# Altium PCB DB32.PcbDoc (part 3 of 8)
Units mil, origin at the board's own origin, x right, y up, seen from the top; angles counter-clockwise.
Board outline 3236.22 x 4456.69 mil, 8 copper layers (Top Layer, MidLayer1, MidLayer2, GND-Layer5, MidLayer3, VCC, MidLayer4, Bottom Layer), stack 61.8 mil thick; 207 components, 474 nets, 1777 pads, 1474 vias.
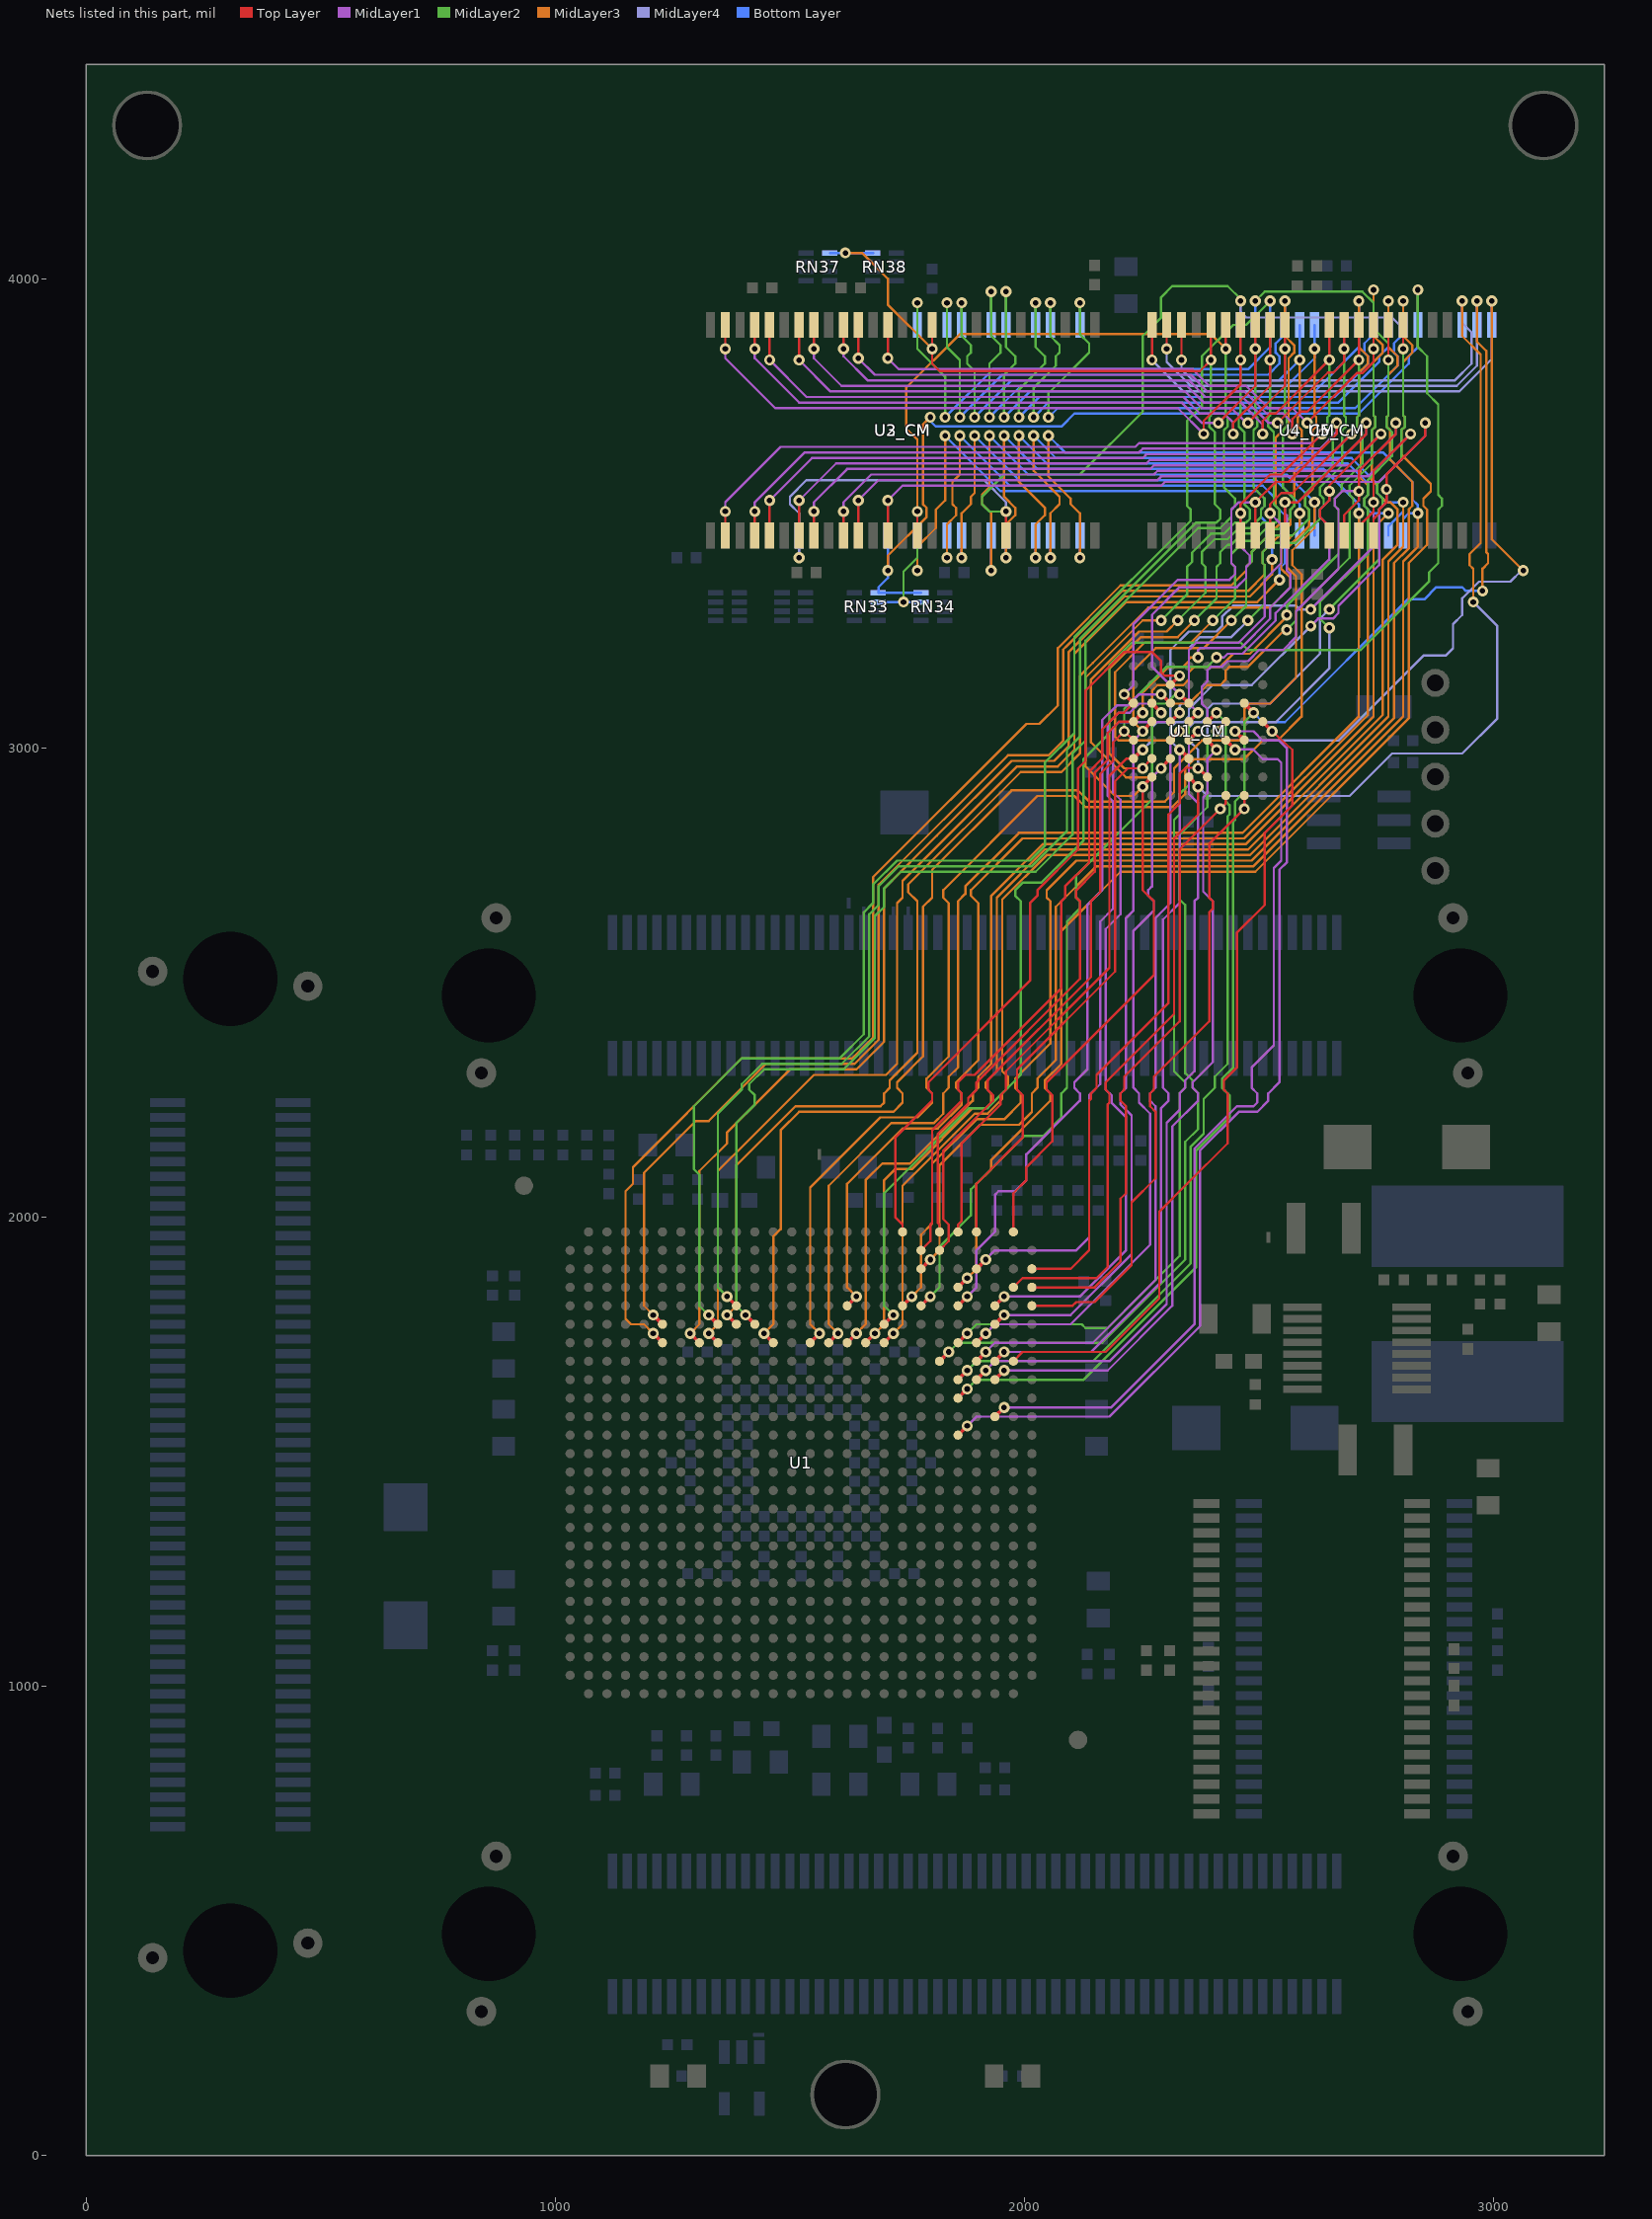
[diagram p9: the nets of this part, all layers, seen from the top]

## Via types
v1: diameter 23.62, hole 11.81, Top Layer to Bottom Layer, 839 vias
v2: diameter 23.62, hole 11.81, Top Layer to Bottom Layer, tented both sides, 499 vias
v3: diameter 27.56, hole 15.75, Top Layer to Bottom Layer, 135 vias
v4: diameter 23.62, hole 11.81, Top Layer to Bottom Layer, tented top, 1 vias

## Nets (pads, with @x,y where several pads share a name; then routed paths per layer and width w, separated by ;. In a path a pad name is that pad's centre, name@x,y a point inside that pad or via, vN(x,y) a via of type N, cw(c..) or ccw(c..) an arc to the next point about the centre after c; other vN are vias at no path point) (continued)
BUS_A16: U1.C26 U1_CM.D7 U2_CM.21 U3_CM.21 U4_CM.27 U5_CM.27 | length 4718.6
  Top Layer w5: U2_CM.21@1960.63,3452.76 v2(1960.63,3503.93) ; U1.C26@2015.75,1889.76 2078.74,1889.76 2090.55,1889.76 2098.43,1889.76 2137.8,1929.13 2137.8,2248.03 2141.73,2251.97 2141.73,2263.78 2153.54,2275.59 2153.54,2303.15 2307.09,2456.69 2307.09,2858.27 2330.71,2881.89 2330.71,2944.88 2343.51,2957.68 v1@2370.08,2957.68 ; v2(2807.09,3850.39) U4_CM.27@2807.09,3901.57
  Top Layer w7.87: v1@2370.08,2957.68 2370.57,2957.19 U1_CM.D7@2389.76,2937.99
  MidLayer2 w5: v2(1960.63,3503.93) 1925.2,3503.93 1909.45,3519.68 1909.45,3535.43 1925.2,3551.18 1956.69,3582.68 2118.11,3582.68 2251.97,3716.54 2251.97,3877.95 2291.34,3917.32 2291.34,3960.63 2314.96,3984.25 2433.07,3984.25 2460.63,3956.69 v2(2460.63,3952.76) ; v1(2649.61,3295.28) 2755.91,3401.57 2755.91,3507.87 2763.78,3515.75 2763.78,3531.5 2751.97,3543.31 2751.97,3562.99 2803.15,3614.17 2803.15,3677.17 2811.02,3685.04 2811.02,3704.72 2807.09,3708.66 v2(2807.09,3850.39)
  MidLayer4 w5: v2(1519.68,3405.51) 1519.68,3500 1500,3519.68 1500,3535.43 1535.43,3570.87 1913.38,3570.87 1960.63,3523.63 v2(1960.63,3503.93) ; v1(2370.08,2956.69) 2370.08,2996.06 2350.39,3015.75 2350.39,3043.31 2362.2,3055.12 2377.95,3055.12 2389.76,3066.93 2389.76,3082.68 2401.57,3094.49 2523.62,3094.49 2629.92,3200.79 2629.92,3275.59 v1(2649.61,3295.28) ; v2(2460.63,3952.76) 2460.63,3929.13 2472.44,3917.32 2783.46,3917.32 2807.09,3893.7 v2(2807.09,3850.39)
  Bottom Layer w5: v2(1519.68,3405.51) U3_CM.21@1519.68,3452.76 ; U5_CM.27@2460.63,3901.57 v2(2460.63,3952.76)
BUS_A17: U1.D25 U1_CM.E7 U4_CM.42 U5_CM.42 | length 3942.3
  Top Layer w5: U1.D25@1976.38,1850.39 1996.06,1870.08 2078.74,1870.08 2090.55,1870.08 2153.54,1870.08 2177.17,1893.7 2177.17,2240.16 2181.1,2244.09 2181.1,2263.78 2173.23,2271.65 2173.23,2287.4 2318.9,2433.07 2318.9,2807.09 2370.08,2858.27 v1(2370.08,2917.32) ; v2(2334.64,3826.77) U4_CM.42@2334.64,3901.57
  Top Layer w7.87: U1_CM.E7@2350.39,2937.99 v1(2370.08,2917.32)
  MidLayer3 w5: v2(2933.07,3952.76) 2933.07,3877.95 2972.44,3838.58 2972.44,3437.01 2948.82,3413.39 2948.82,3389.76 2956.69,3381.89 v1(2956.69,3311.02)
  MidLayer4 w5: v2(2334.64,3826.77) 2334.64,3807.09 2358.27,3783.46 2917.32,3783.46 2952.76,3818.9 2952.76,3885.83 2933.07,3905.51 v2(2933.07,3952.76) ; v1(2370.08,2917.32) 2389.76,2897.64 2692.91,2897.64 2783.46,2988.19 2933.07,2988.19 3007.87,3062.99 3007.87,3259.84 v1(2956.69,3311.02)
  Bottom Layer w5: U5_CM.42@2933.07,3901.57 v2(2933.07,3952.76)
BUS_A18: U1.K22 U1_CM.B3 U4_CM.43 U5_CM.43 | length 4116.9
  Top Layer w5: v2(2303.15,3850.39) U4_CM.43@2303.15,3901.57 ; v1(2488.19,3074.8) v1@2488.19,3075.79
  Top Layer w7.87: U1.K22@1858.27,1614.17 v1(1877.96,1633.86) ; U1_CM.B3@2468.5,3095.47 v1@2488.19,3075.79
  MidLayer2 w5: v1(1877.96,1633.86) 1897.64,1653.54 2078.74,1653.54 2090.55,1653.54 2125.98,1653.54 2366.14,1893.7 2366.14,2141.73 2437.01,2212.6 2437.01,2259.84 2421.26,2275.59 2421.26,2295.28 2444.88,2318.9 2444.88,2673.23 2444.88,2842.52 2448.82,2846.46 2448.82,2885.83 2468.5,2905.51 2468.5,2976.38 2468.5,3055.12 v1(2488.19,3074.8)
  MidLayer3 w5: v2(2964.57,3952.76) 2964.57,3866.14 2984.25,3846.46 2984.25,3417.32 2988.19,3413.39 2988.19,3393.7 2976.38,3381.89 v1(2976.38,3334.65)
  MidLayer4 w5: v2(2303.15,3850.39) 2303.15,3822.83 2354.33,3771.65 2921.26,3771.65 2964.57,3814.96 v2(2964.57,3952.76)
  Bottom Layer w5: v1(2488.19,3074.8) 2507.87,3055.12 2555.12,3055.12 2816.68,3316.68 2852.11,3316.68 2877.95,3342.52 2933.07,3342.52 2940.94,3334.65 v1(2976.38,3334.65) ; U5_CM.43@2964.57,3901.57 v2(2964.57,3952.76)
BUS_A19: U1.H21 U1_CM.C4 U4_CM.44 U5_CM.44 | length 4323.6
  Top Layer w5: v2(2271.65,3826.77) U4_CM.44@2271.65,3901.57
  Top Layer w7.87: U1.H21@1818.9,1692.91 v1(1838.59,1712.6) ; v1(2409.45,3035.43) U1_CM.C4@2429.13,3056.1
  MidLayer2 w5: v1(1838.59,1712.6) 1858.27,1732.28 2078.74,1732.28 2090.55,1732.28 2165.35,1732.28 2342.52,1909.45 2342.52,2160.43 2370.08,2187.99 2370.08,2263.78 2358.27,2275.59 2358.27,2291.34 2342.52,2307.09 2342.52,2665.35 2330.71,2677.17 2330.71,2814.96 2389.76,2874.02 2389.76,3015.75 v1(2409.45,3035.43)
  MidLayer3 w5: v2(2996.06,3952.76) 2996.06,3633.86 2996.06,3444.88 v1(3062.99,3377.95)
  MidLayer4 w5: v2(2271.65,3826.77) 2338.58,3759.84 2926.67,3759.84 2996.06,3829.23 v2(2996.06,3952.76) ; v1(2409.45,3035.43) 2429.13,3015.75 2669.29,3015.75 2850.39,3196.85 2897.64,3196.85 2913.39,3212.6 2913.39,3263.78 2933.07,3283.46 2933.07,3318.9 2968.5,3354.33 3035.43,3354.33 3059.06,3377.95 v1(3062.99,3377.95)
  Bottom Layer w5: U5_CM.44@2996.06,3901.57 v2(2996.06,3952.76)
BUS_A20: U1.J24 U1_CM.D5 U4_CM.28 U5_CM.28 | length 3363.5
  Top Layer w5: v2(2775.59,3826.77) U4_CM.28@2775.59,3901.57
  Top Layer w7.87: U1.J24@1937.01,1653.54 v1(1956.7,1673.23) ; U1_CM.D5@2389.76,3016.73 v1(2409.45,2996.06)
  MidLayer1 w5: v1(1956.7,1673.23) 2078.74,1673.23 2090.55,1673.23 2177.17,1673.23 2314.96,1811.02 2314.96,2192.91 2370.08,2248.03 2370.08,2263.78 2358.27,2275.59 2358.27,2287.4 2401.57,2330.71 2401.57,2673.23 2380.91,2693.9 2380.91,2894.69 2389.76,2903.54 2389.76,2976.38 v1(2409.45,2996.06)
  MidLayer2 w5: v2(2492.13,3952.76) 2511.81,3972.44 2720.47,3972.44 2744.09,3948.82 2744.09,3893.7 2775.59,3862.21 v2(2775.59,3826.77) 2775.59,3708.66 2771.65,3704.72 2771.65,3685.04 2783.46,3673.23 2783.46,3622.05 2732.28,3570.87 2732.28,3539.37 2724.41,3531.5 2724.41,3515.75 2732.28,3507.87 2732.28,3413.39 2629.92,3311.02 2629.92,3275.59 v1(2649.61,3255.91)
  MidLayer4 w5: v1(2409.45,2996.06) 2389.76,3015.75 2389.76,3043.31 2401.57,3055.12 2535.43,3055.12 2649.61,3169.29 v1(2649.61,3255.91)
  Bottom Layer w5: U5_CM.28@2492.13,3901.57 v2(2492.13,3952.76)
BUS_A21: U1.J22 U1_CM.D4 | length 1844.8
  Top Layer w7.87: U1.J22@1858.27,1653.54 v1(1877.96,1673.23) ; U1_CM.D4@2389.76,3056.1 v1(2409.45,3074.8)
  MidLayer2 w5: v1(1877.96,1673.23) 1897.64,1692.91 2078.74,1692.91 2090.55,1692.91 2145.67,1692.91 2354.33,1901.57 2354.33,2150.59 2381.89,2178.15 2381.89,2251.97 2405.51,2275.59 2405.51,2299.21 2433.07,2326.77 2433.07,2749.01 2433.07,2854.33 2437.01,2858.27 2437.01,2877.95 2429.13,2885.83 2429.13,2909.45 2429.13,3055.12 v1(2409.45,3074.8)
BUS_A22: U1.L24 U1_CM.C5 | length 1949.8
  Top Layer w7.87: U1.L24@1937.01,1574.8 v1(1956.7,1594.49) ; U1_CM.C5@2429.13,3016.73 v1@2448.82,2997.05
  MidLayer1 w5: v1(1956.7,1594.49) 2078.74,1594.49 2090.55,1594.49 2185.04,1594.49 2362.2,1771.65 2362.2,2145.67 2452.76,2236.22 2488.19,2236.22 2496.06,2244.09 2496.06,2263.78 2484.25,2275.59 2484.25,2318.9 2531.5,2366.14 2531.5,2744.09 2547.24,2759.84 2547.24,2968.5 2539.37,2976.38 2507.87,2976.38 2487.2,2997.05 v1@2448.82,2997.05
  Bottom Layer w5: v1@2447.83,2997.05 v1@2448.82,2997.05
  other v1: 2448.82,2996.06
BUS_A23: U1.E26 U1_CM.B8 | length 1380.3
  Top Layer w5: U1.E26@2015.75,1811.02 2078.74,1811.02 2090.55,1811.02 2102.36,1811.02 2110.24,1818.9 2149.6,1818.9 2228.35,1897.64 2228.35,2031.5 2279.53,2082.68 2279.53,2224.41 2267.72,2236.22 2267.72,2263.78 2275.59,2271.65 2275.59,2299.21 2393.7,2417.32 2393.7,2649.61 2401.57,2657.48 2401.57,2673.23 2393.7,2681.1 2393.7,2731.56 ; 2393.7,2716.54 2393.7,2795.28 v1(2468.51,2870.08) U1_CM.B8@2468.5,2898.62
BUS_A24: U1.D26 U1_CM.C8 | length 1307.7
  Top Layer w5: U1.D26@2015.75,1850.39 2078.74,1850.39 2090.55,1850.39 2149.61,1850.39 2204.72,1905.51 2204.72,2039.37 2216.54,2051.18 2216.54,2236.22 2204.72,2248.03 2204.72,2263.78 2212.6,2271.65 2212.6,2299.21 2330.71,2417.32 2330.71,2783.46 v1(2417.32,2870.08) 2429.14,2881.89 U1_CM.C8@2429.13,2898.62
BUS_D0: U1.E20 U1_CM.E3 U2_CM.2 U4_CM.7 | length 3888
  Top Layer w5: U2_CM.2@1362.2,3452.76 v2(1362.2,3503.93) ; U4_CM.7@2460.63,3452.76 v1(2460.63,3500) 2460.63,3519.69 2523.62,3582.68 2547.24,3582.68 v2(2633.86,3669.29)
  Top Layer w7.87: U1.E20@1779.53,1811.02 v1(1799.21,1830.71) ; v1(2330.71,3114.17) U1_CM.E3@2350.4,3095.48
  MidLayer1 w5: v2(1362.2,3503.93) 1362.2,3523.62 1480.31,3641.73 2236.22,3641.73 2244.09,3649.61 2614.17,3649.61 v2(2633.86,3669.29) ; v1(2330.71,3114.17) 2271.65,3173.23 2271.65,3283.46 2330.71,3342.52 2452.76,3342.52 2472.44,3362.2 2472.44,3385.83 2480.31,3393.7 2480.31,3409.45 2460.63,3429.13 v1(2460.63,3500)
  MidLayer2 w5: v1(1799.21,1830.71) 1818.9,1850.39 1818.9,1937.01 1885.83,2003.94 1885.83,2031.5 1885.83,2043.31 1885.83,2059.06 2000,2173.23 2039.37,2173.23 2078.74,2212.6 2078.74,2263.78 2090.55,2275.59 2090.55,2629.92 2118.11,2657.48 2118.11,2673.23 2110.24,2681.1 2110.24,2728.35 2271.65,2889.76 2271.65,3086.61 2279.53,3094.49 2302.17,3094.49 2321.85,3114.17 v1(2330.71,3114.17)
BUS_D1: U1.B20 U1_CM.H3 U2_CM.4 U4_CM.8 | length 3743.3
  Top Layer w5: U2_CM.4@1425.2,3452.76 v2(1425.19,3503.93) ; U1.B20@1779.53,1929.13 1799.21,1948.82 1799.21,1984.25 1803.15,1988.19 1803.15,2031.5 1803.15,2043.31 1803.15,2185.04 1866.14,2248.03 1866.14,2263.78 1858.27,2271.65 1858.27,2287.4 1874.02,2303.15 1893.7,2303.15 2078.74,2488.19 2078.74,2673.23 2086.61,2681.1 2086.61,2704.73 2137.8,2755.91 2137.8,2949.54 2165.35,2977.1 2165.35,3039.37 2201.28,3075.3 2212.1,3075.3 U1_CM.H3@2232.29,3095.48 ; U4_CM.8@2492.13,3452.76 v1(2492.13,3523.62) 2535.43,3566.93 2562.99,3566.93 2665.35,3669.29 v2(2665.35,3692.91)
  Top Layer w7.87: v1(2212.6,3114.17) U1_CM.H3@2232.29,3095.48
  MidLayer1 w5: v2(1425.19,3503.93) 1425.19,3523.62 1531.5,3629.92 2244.09,3629.92 2251.97,3637.8 2629.92,3637.8 2665.35,3673.23 v2(2665.35,3692.91) ; v1(2212.6,3114.17) 2232.28,3133.86 2232.28,3263.78 2326.77,3358.27 2437.01,3358.27 2448.82,3370.08 2448.82,3385.83 2440.94,3393.7 2440.94,3507.87 2456.69,3523.62 v1(2492.13,3523.62)
BUS_D2: U1.G22 U1_CM.E4 U2_CM.5 U4_CM.9 | length 4029.6
  Top Layer w5: U2_CM.5@1456.69,3452.76 v2(1456.69,3527.55) ; U4_CM.9@2523.62,3452.76 v1(2523.62,3500) 2523.62,3519.69 2547.24,3543.31 2570.87,3543.31 v2(2696.85,3669.29)
  Top Layer w7.87: U1.G22@1858.27,1732.28 v1(1877.95,1751.97) ; U1_CM.E4@2350.39,3056.1 v1(2370.08,3074.81)
  MidLayer1 w5: v2(1456.69,3527.55) 1547.24,3618.11 2251.97,3618.11 2259.84,3625.98 2653.54,3625.98 v2(2696.85,3669.29) ; v1(2370.08,3074.81) 2350.39,3094.5 2350.39,3208.66 2366.14,3224.41 2456.69,3224.41 2511.81,3279.53 2511.81,3358.27 2547.24,3393.7 2547.24,3476.38 v1(2523.62,3500)
  MidLayer2 w5: v1(1877.95,1751.97) 1897.64,1771.65 2078.74,1771.65 2090.55,1771.65 2122.05,1771.65 2129.92,1763.78 2177.17,1763.78 2330.71,1917.32 2330.71,2263.78 2342.52,2275.59 2342.52,2287.4 2318.9,2311.02 2318.9,2846.46 2330.71,2858.27 2330.71,2901.57 2350.39,2921.26 2350.39,3055.12 v1(2370.08,3074.81)
BUS_D3: U1.A21 U1_CM.H4 U2_CM.7 U4_CM.10 | length 3670.1
  Top Layer w5: U2_CM.7@1519.69,3452.76 v2(1519.68,3527.56) ; U1.A21@1818.9,1968.5 1818.9,1984.25 1814.96,1988.19 1814.96,2031.5 1814.96,2043.31 1814.96,2177.17 1879.92,2242.13 1879.92,2253.94 1897.64,2271.65 1897.64,2287.4 2118.11,2507.87 2118.11,2673.23 2110.24,2681.1 2110.24,2696.85 2149.61,2736.22 2149.61,2947.21 2177.17,2974.77 2177.17,3031.5 2201.78,3056.11 U1_CM.H4@2232.28,3056.1 ; U4_CM.10@2555.12,3452.76 v1(2555.12,3523.62) 2582.68,3523.62 2640.75,3581.69 2728.35,3669.29 v2(2728.35,3692.91)
  Top Layer w7.87: U1_CM.H4@2232.28,3056.1 v1@2251.47,3075.3
  MidLayer1 w5: v2(1519.68,3527.56) 1598.43,3606.3 2259.84,3606.3 2267.72,3614.17 2673.23,3614.17 2728.35,3669.29 v2(2728.35,3692.91) ; v1(2370.08,3192.91) 2370.08,3208.66 2374.02,3212.6 2460.63,3212.6 2523.62,3275.59 2523.62,3299.21 2566.93,3342.52 2566.93,3370.08 2559.06,3377.95 2559.06,3496.06 2555.12,3500 v1(2555.12,3523.62)
  MidLayer3 w5: v1(2251.97,3074.8) 2251.97,3118.11 2255.91,3122.05 2307.09,3173.23 2338.58,3173.23 2350.39,3185.04 2350.39,3188.98 2354.33,3192.91 v1(2370.08,3192.91)
BUS_D4: U1.B21 U1_CM.H5 U2_CM.8 U4_CM.13 | length 3722
  Top Layer w5: U2_CM.8@1551.18,3452.76 v2(1551.18,3503.94) ; U1.B21@1818.9,1929.13 1838.58,1948.82 1838.58,1984.25 1826.77,1996.06 1826.77,2031.5 1826.77,2043.31 1826.77,2141.73 1933.07,2248.03 1933.07,2259.84 1921.26,2271.65 1921.26,2291.34 2141.73,2511.81 2141.73,2673.23 2161.42,2692.91 2161.42,2944.88 2188.98,2972.44 2188.98,3011.81 v1(2212.6,3035.43) U1_CM.H5@2232.28,3016.73 ; U4_CM.13@2649.61,3452.76 2649.61,3472.44 2629.92,3492.13 2629.92,3507.87 2649.61,3527.56 v1(2649.61,3547.24) 2649.61,3559.06 v2(2759.84,3669.29)
  MidLayer1 w5: v2(1551.18,3503.94) 1551.18,3523.62 1622.05,3594.49 2267.72,3594.49 2275.59,3602.36 2692.91,3602.36 v2(2759.84,3669.29) ; v1(2409.45,3192.91) 2425.2,3192.91 2433.07,3200.79 2464.57,3200.79 2535.43,3271.65 2535.43,3287.4 2649.61,3401.57 2649.61,3472.44 2629.92,3492.13 2629.92,3507.87 2649.61,3527.56 v1(2649.61,3547.24)
  MidLayer2 w5: v1(2212.6,3035.43) 2212.6,3082.68 2303.15,3173.23 2389.76,3173.23 v1(2409.45,3192.91)
BUS_D5: U1.J23 U1_CM.E5 U2_CM.10 U4_CM.14 | length 4157.5
  Top Layer w5: U2_CM.10@1614.17,3452.76 v2(1614.17,3503.93) ; U4_CM.14@2681.1,3452.76 2681.1,3496.06 2712.6,3527.56 v1(2712.6,3547.24) 2712.6,3590.55 2791.34,3669.29 v2(2791.34,3692.91)
  Top Layer w7.87: U1.J23@1897.64,1653.54 v1(1917.33,1673.23) ; U1_CM.E5@2350.39,3016.73 v1(2370.08,3035.43)
  MidLayer1 w5: v2(1614.17,3503.93) 1614.17,3523.62 1673.23,3582.68 2275.59,3582.68 2283.46,3590.55 2712.6,3590.55 2791.34,3669.29 v2(2791.34,3692.91) ; v1(1917.33,1673.23) 1937.01,1692.91 2078.74,1692.91 2090.55,1692.91 2181.1,1692.91 2303.15,1814.96 2303.15,2200.79 2330.71,2228.35 2330.71,2263.78 2342.52,2275.59 2342.52,2291.34 2362.2,2311.02 2362.2,2673.23 2370.08,2681.1 2370.08,2720.47 ; 2370.08,2704.72 2370.08,2720.47 ; v1(2712.6,3547.24) 2677.17,3547.24 2661.42,3531.5 2661.42,3515.75 2669.29,3507.87 2669.29,3381.89 2578.74,3291.34 2578.74,3236.22 2551.18,3208.66 2500,3208.66 2476.38,3185.04 2433.07,3185.04 2421.26,3173.23 2397.64,3173.23 2389.76,3165.35 2389.76,3141.73 2377.95,3129.92 2377.95,3094.49 2389.76,3082.68 2389.76,3055.12 v1(2370.08,3035.43) 2350.39,3015.75 2350.39,2901.57 2370.08,2881.89 2370.08,2720.47
BUS_D6: U1.A22 U1_CM.H6 U2_CM.11 U4_CM.15 | length 3658.7
  Top Layer w5: U2_CM.11@1645.67,3452.76 v2(1645.66,3527.55) ; U1.A22@1858.27,1968.5 1858.27,1984.25 1866.14,1992.13 1866.14,2031.5 1866.14,2043.31 1866.14,2157.48 1948.82,2240.16 1948.82,2259.84 1960.63,2271.65 1960.63,2311.02 2181.1,2531.5 2181.1,2940.94 2217.52,2977.37 U1_CM.H6@2232.28,2977.36 ; U4_CM.15@2712.6,3452.76 2712.6,3472.44 2744.09,3503.94 v1(2744.09,3523.62) 2744.09,3590.55 v2(2822.83,3669.29)
  Top Layer w7.87: U1_CM.H6@2232.28,2977.36 2251.47,2996.56 v1@2251.97,2997.05
  MidLayer1 w5: v2(1645.66,3527.55) 1688.98,3570.87 2283.46,3570.87 2291.34,3578.74 2732.28,3578.74 v2(2822.83,3669.29) ; v1(2610.24,3295.28) 2744.09,3429.13 v1(2744.09,3523.62)
  MidLayer4 w5: v1(2251.97,2996.06) 2271.65,3015.75 2271.65,3043.31 2283.46,3055.12 2303.15,3055.12 2311.02,3062.99 2311.02,3208.66 2350.39,3248.03 2409.45,3248.03 2421.26,3259.84 2421.26,3279.53 2444.88,3303.15 2578.74,3303.15 2586.61,3295.28 v1(2610.24,3295.28)
BUS_D7: U1.H24 U1_CM.E6 U2_CM.13 U4_CM.16 | length 4054
  Top Layer w5: U2_CM.13@1708.66,3452.76 v2(1708.66,3527.55) ; U4_CM.16@2744.09,3452.76 2744.09,3488.19 2755.91,3500 2755.91,3507.87 2771.65,3523.62 v1(2771.65,3551.18) 2771.65,3582.68 2854.33,3665.35 v2(2854.33,3692.91)
  Top Layer w7.87: U1.H24@1937.01,1692.91 v1(1956.7,1712.6) ; v1@2330.71,2997.05 2331.2,2996.56 U1_CM.E6@2350.39,2977.36
  MidLayer1 w5: v2(1708.66,3527.55) 1740.16,3559.06 2291.34,3559.06 2299.21,3566.93 2755.91,3566.93 2854.33,3665.35 v2(2854.33,3692.91) ; v1(1956.7,1712.6) 2078.74,1712.6 2090.55,1712.6 2141.73,1712.6 2291.34,1862.2 2291.34,2232.28 2307.09,2248.03 2307.09,2263.78 2295.28,2275.59 2295.27,2633.86 2330.71,2669.29 2330.71,2700.79 ; 2330.71,2681.1 v1(2330.71,2996.06) v1@2330.71,2997.05 ; v1(2610.24,3259.84) 2625.98,3275.59 2657.48,3275.59 2669.29,3287.4 2669.29,3303.15 2755.91,3389.76 2755.91,3507.87 2771.65,3523.62 v1(2771.65,3551.18)
  MidLayer4 w5: v1(2330.71,2996.06) 2311.02,3015.75 2311.02,3043.31 2322.83,3055.12 2338.58,3055.12 2350.39,3066.93 2350.39,3082.68 2401.57,3133.86 2484.25,3133.86 v1(2610.24,3259.84)
BUS_D8: U1.E22 U1_CM.F3 U2_CM.42 U4_CM.29 | length 3915.8
  Top Layer w5: v2(1708.66,3830.71) U2_CM.42@1708.66,3901.57 ; v2(2602.36,3692.91) 2708.17,3798.72 2719.98,3798.72 2744.09,3822.83 v2(2744.09,3850.39) U4_CM.29@2744.09,3901.57
  Top Layer w7.87: U1.E22@1858.27,1811.02 v1(1877.95,1830.71) ; v1@2291.34,3115.16 2291.83,3114.67 U1_CM.F3@2311.03,3095.48
  MidLayer1 w5: v2(1708.66,3830.71) 1732.28,3807.09 2358.27,3807.09 2393.7,3771.65 2472.44,3771.65 2519.69,3724.41 2570.87,3724.41 v2(2602.36,3692.91) ; v1(1877.95,1830.71) 1897.64,1850.39 1897.64,1929.13 1937.01,1968.5 1937.01,2031.5 1937.01,2043.31 1937.01,2047.24 1944.88,2055.12 1980.31,2055.12 2003.94,2078.74 2003.94,2133.86 2118.11,2248.03 2118.11,2263.78 2106.3,2275.59 2106.3,2287.4 2133.86,2314.96 2133.86,2665.35 2165.35,2696.85 2165.35,3059.06 2196.85,3090.55 2220.47,3090.55 2244.09,3114.17 v1(2291.34,3114.17)
  MidLayer2 w5: v1(2559.06,3251.97) 2578.74,3271.65 2578.74,3291.34 2692.91,3405.51 2692.91,3507.87 2700.79,3515.75 2700.79,3531.5 2692.91,3539.37 2692.91,3559.06 2740.16,3606.3 2740.16,3677.17 2748.03,3685.04 2748.03,3704.72 2744.09,3708.66 v2(2744.09,3850.39)
  MidLayer3 w5: v1(2291.34,3114.17) 2311.02,3094.49 2350.39,3094.49 2389.76,3133.86 2417.32,3133.86 2429.13,3145.67 2429.13,3165.35 2437.01,3173.23 2476.38,3173.23 2555.12,3251.97 v1(2559.06,3251.97)
BUS_D9: U1.C23 U1_CM.G3 U2_CM.44 U4_CM.30 | length 4002.3
  Top Layer w5: v2(1645.67,3830.71) U2_CM.44@1645.67,3901.57 ; v2(2570.87,3669.29) 2570.87,3700.79 2586.61,3716.54 2602.36,3716.54 v2(2712.6,3826.77) U4_CM.30@2712.6,3901.57
  Top Layer w7.87: U1.C23@1897.64,1889.76 v1(1917.32,1909.45) ; U1_CM.G3@2271.65,3095.48 v1(2291.34,3074.8)
  MidLayer1 w5: v2(1645.67,3830.71) 1681.1,3795.28 2354.33,3795.28 2389.76,3759.84 2469,3759.84 2516.24,3712.6 2551.18,3712.6 2570.87,3692.91 v2(2570.87,3669.29) ; v1(1917.32,1909.45) 1937.01,1929.13 2078.74,1929.13 2090.55,1929.13 2110.24,1929.13 2137.8,1956.69 2137.8,2259.84 2161.42,2283.46 2161.42,2629.92 2188.98,2657.48 2188.98,2724.41 ; 2188.98,2700.79 2188.98,2885.83 2177.17,2897.64 2177.17,3051.18 2200.79,3074.8 2224.41,3074.8 2244.09,3094.49 2271.65,3094.49 v1(2291.34,3074.8)
  MidLayer2 w5: v1(2559.06,3283.46) 2559.06,3303.15 2669.29,3413.39 2669.29,3507.87 2661.42,3515.75 2661.42,3531.5 2676.18,3546.26 2676.18,3562.01 2720.47,3606.3 2720.47,3673.23 2708.66,3685.04 2708.66,3704.72 2712.6,3708.66 v2(2712.6,3826.77)
  MidLayer3 w5: v1(2291.34,3074.8) 2271.65,3094.49 2271.65,3122.05 2283.46,3133.86 2338.58,3133.86 2350.39,3145.67 2350.39,3161.42 2362.2,3173.23 2417.32,3173.23 2444.88,3200.79 2480.31,3200.79 2559.06,3279.53 v1(2559.06,3283.46)
BUS_D10: U1.E24 U1_CM.F4 U2_CM.45 U4_CM.31 | length 3995.9
  Top Layer w5: v2(1614.17,3850.39) U2_CM.45@1614.17,3901.57 ; v2@2537.4,3694.88 2539.37,3694.88 2541.34,3694.88 2646.65,3800.2 2658.46,3800.2 2681.1,3822.83 v2(2681.1,3850.39) U4_CM.31@2681.1,3901.57
  Top Layer w7.87: U1.E24@1937.01,1811.02 v1(1956.69,1830.71) ; U1_CM.F4@2311.02,3056.1 v1(2330.71,3074.8)
  MidLayer1 w5: v2(1614.17,3850.39) 1614.17,3834.65 1665.35,3783.46 2350.39,3783.46 2385.83,3748.03 2464.57,3748.03 2519.69,3692.91 v2(2539.37,3692.91) ; v1(1956.69,1830.71) 2078.74,1830.71 2090.55,1830.71 2118.11,1830.71 2216.54,1929.13 2216.54,2212.6 2186.02,2243.11 2186.02,2258.86 2173.23,2271.65 2173.23,2614.17 2204.72,2645.67 2204.72,2889.76 2188.98,2905.51 2188.98,3043.31 2200.79,3055.12 2311.02,3055.12 v1(2330.71,3074.8)
  MidLayer2 w5: v1(2476.38,3271.65) 2511.81,3307.09 2511.81,3389.76 2507.87,3393.7 2507.87,3417.32 2527.56,3437.01 2578.74,3437.01 2629.92,3488.19 2629.92,3507.87 2637.8,3515.75 2637.8,3531.5 2629.92,3539.37 2629.92,3555.12 2677.16,3602.36 2677.16,3677.17 2685.04,3685.04 2685.04,3704.72 2681.1,3708.66 v2(2681.1,3850.39)
  MidLayer4 w5: v1(2330.71,3074.8) 2330.71,3090.55 2334.65,3094.49 2342.52,3094.49 2350.39,3102.36 2350.39,3212.6 2374.02,3236.22 2440.94,3236.22 v1(2476.38,3271.65)
BUS_D11: U1.F24 U1_CM.G4 U2_CM.47 U4_CM.32 | length 4007.9
  Top Layer w5: v2(1551.18,3850.39) U2_CM.47@1551.18,3901.57 ; v2(2507.87,3669.29) 2507.87,3696.85 2523.62,3712.6 2535.43,3712.6 v2(2649.61,3826.77) U4_CM.32@2649.61,3901.57
  Top Layer w7.87: U1.F24@1937.01,1771.65 v1(1956.7,1791.34) ; v1(2251.97,3035.43) U1_CM.G4@2271.65,3056.1
  MidLayer1 w5: v2(1551.18,3850.39) 1551.18,3830.71 1610.24,3771.65 2346.46,3771.65 2381.89,3736.22 2460.63,3736.22 2507.87,3688.98 v2(2507.87,3669.29) ; v1(1956.7,1791.34) 2078.74,1791.34 2090.55,1791.34 2098.43,1791.34 2228.35,1921.26 2228.35,2216.54 2204.68,2240.21 2204.68,2263.73 2216.54,2275.59 2216.54,2637.8 2232.28,2653.54 2232.28,2669.29 2232.28,3015.75 v1(2251.97,3035.43)
  MidLayer2 w5: v1(2440.94,3271.65) 2472.44,3303.15 2472.44,3385.83 2484.25,3397.64 2484.25,3417.32 2519.69,3452.76 2570.87,3452.76 2606.3,3488.19 2606.3,3507.87 2598.43,3515.75 2598.43,3543.31 2657.48,3602.36 2657.48,3673.23 2645.67,3685.04 2645.67,3704.72 2649.61,3708.66 v2(2649.61,3826.77)
  MidLayer3 w5: v1(2251.97,3035.43) 2232.28,3055.12 2232.28,3165.35 2279.53,3212.6 2381.89,3212.6 v1(2440.94,3271.65)
BUS_D12: U1.H23 U1_CM.F5 U2_CM.48 U4_CM.35 | length 4255.5
  Top Layer w5: v2(1519.68,3826.77) U2_CM.48@1519.69,3901.57 ; v2(2476.38,3692.91) 2555.12,3771.65 v2(2555.12,3850.39) U4_CM.35@2555.12,3901.57
  Top Layer w7.87: U1.H23@1897.64,1692.91 v1(1917.33,1712.6) ; U1_CM.F5@2311.02,3016.73 v1(2330.71,3035.43)
  MidLayer1 w5: v2(1519.68,3826.77) 1586.6,3759.84 2342.52,3759.84 2377.95,3724.41 2440.94,3724.41 2472.44,3692.91 v2(2476.38,3692.91) ; v1(1917.33,1712.6) 1937.01,1732.28 2078.74,1732.28 2090.55,1732.28 2145.67,1732.28 2279.53,1866.14 2279.53,2236.22 2267.72,2248.03 2267.72,2263.78 2279.53,2275.59 2279.53,2637.79 2311.02,2669.29 2311.02,3015.75 v1(2330.71,3035.43) 2330.22,3035.93 v1@2326.78,3039.37
  MidLayer2 w5: v1(2401.57,3271.65) 2448.82,3318.9 2448.82,3385.83 2440.94,3393.7 2440.94,3413.39 2468.5,3440.94 2488.19,3440.94 2513.78,3466.54 2541.34,3466.54 2547.24,3472.44 2566.93,3492.13 2566.93,3507.87 2574.8,3515.75 2574.8,3531.5 2555.12,3551.18 2551.18,3555.12 2551.18,3677.17 2559.05,3685.04 2559.05,3704.72 2555.12,3708.66 v2(2555.12,3850.39)
  MidLayer3 w5: v1(2330.71,3035.43) 2311.02,3015.75 2200.79,3015.75 2192.91,3023.62 2192.91,3161.42 2255.91,3224.41 2354.33,3224.41 v1(2401.57,3271.65)
BUS_D13: U1.A23 U1_CM.G6 U2_CM.50 U4_CM.36 | length 3776.1
  Top Layer w5: v2(1456.69,3826.77) U2_CM.50@1456.69,3901.57 ; U1.A23@1897.64,1968.5 1897.64,2031.5 1897.64,2043.31 1897.64,2070.87 1996.06,2169.29 1996.06,2259.84 1984.25,2271.65 1984.25,2314.96 2192.91,2523.62 2192.91,2838.58 ; 2192.91,2822.83 2192.91,2929.14 2220.47,2956.69 v1(2251.97,2956.69) ; v1@2251.97,2957.68 U1_CM.G6@2271.65,2977.36 ; v2(2444.88,3669.29) 2444.88,3692.91 2523.62,3771.65 v2(2523.62,3826.77) U4_CM.36@2523.62,3901.57
  MidLayer1 w5: v2(1456.69,3826.77) 1535.43,3748.03 2338.58,3748.03 2374.02,3712.6 2425.2,3712.6 2444.88,3692.91 v2(2444.88,3669.29)
  MidLayer2 w5: v1(2362.2,3271.65) 2409.45,3318.9 2409.45,3385.83 2417.32,3393.7 2417.32,3417.32 2433.07,3433.07 2440.94,3433.07 2464.57,3456.69 2484.25,3456.69 2507.87,3480.32 2523.62,3480.32 2535.43,3480.31 2543.31,3488.19 2543.31,3507.87 2531.5,3519.69 2531.5,3673.23 2519.68,3685.04 2519.68,3704.72 2523.62,3708.66 v2(2523.62,3826.77)
  MidLayer3 w5: v1(2251.97,2956.69) 2212.6,2956.69 2181.1,2988.19 2181.1,3169.29 2248.03,3236.22 2326.77,3236.22 v1(2362.2,3271.65)
BUS_D14: U1.G23 U1_CM.F6 U2_CM.51 U4_CM.37 | length 4174.5
  Top Layer w5: v2(1425.2,3850.39) U2_CM.51@1425.2,3901.57 ; v2(2413.38,3692.91) 2492.13,3771.65 v2(2492.13,3850.39) U4_CM.37@2492.13,3901.57
  Top Layer w7.87: U1.G23@1897.64,1732.28 v1(1917.32,1751.97) ; v1@2290.85,2957.19 U1_CM.F6@2311.02,2977.36
  MidLayer1 w5: v2(1425.2,3850.39) 1425.2,3830.71 1519.69,3736.22 2334.65,3736.22 2377.95,3692.91 v2(2413.38,3692.91) ; v1(1917.32,1751.97) 1937.01,1771.65 2078.74,1771.65 2090.55,1771.65 2098.43,1771.65 2267.72,1940.94 2267.72,2220.47 2244.09,2244.09 2244.09,2263.78 2232.28,2275.59 2232.28,2610.24 2275.59,2653.54 2275.59,2673.23 2263.78,2685.04 2263.78,2696.85 2271.65,2704.72 2271.65,2937.01 v1(2291.34,2956.69) v1@2291.34,2957.68
  MidLayer2 w5: v1(2326.77,3271.65) 2385.83,3330.71 2385.83,3385.83 2377.95,3393.7 2377.95,3417.32 2405.51,3444.88 2433.07,3444.88 2456.69,3468.5 2480.31,3468.5 2503.94,3492.13 2503.94,3507.87 2511.81,3515.75 2511.81,3531.5 2492.13,3551.18 2488.19,3555.12 2488.19,3677.17 2496.06,3685.04 2496.06,3704.72 2492.13,3708.66 v2(2492.13,3850.39)
  MidLayer3 w5: v1(2291.34,2956.69) 2271.66,2937.01 2216.54,2937.01 2141.73,3011.81 2141.73,3145.67 2244.09,3248.03 2303.15,3248.03 v1(2326.77,3271.65)
BUS_D15: U1.A25 U1_CM.G7 U2_CM.53 U4_CM.38 | length 3779.7
  Top Layer w5: v2(1362.2,3850.39) U2_CM.53@1362.2,3901.57 ; U1.A25@1976.38,1968.5 1976.38,2031.5 1976.38,2043.31 1976.38,2051.18 2003.94,2078.74 2003.94,2106.3 2059.06,2161.42 2059.06,2259.84 2047.24,2271.65 2047.24,2287.4 2275.59,2515.75 2275.59,2673.23 2251.97,2696.85 2251.97,2819.14 ; 2251.97,2814.96 v1(2251.97,2917.32) v1@2251.97,2918.31 ; v2(2381.89,3669.29) 2381.89,3696.85 2460.63,3775.59 v2(2460.63,3826.77) U4_CM.38@2460.63,3901.57
  Top Layer w7.87: v1@2251.97,2918.31 U1_CM.G7@2271.65,2937.99
  MidLayer1 w5: v2(1362.2,3850.39) 1362.2,3830.71 1468.5,3724.41 2326.77,3724.41 v2(2381.89,3669.29)
  MidLayer2 w5: v1(2291.34,3271.65) 2346.46,3326.77 2346.46,3385.83 2357.28,3396.65 2357.28,3416.34 2397.64,3456.69 2425.2,3456.69 2448.82,3480.32 2472.44,3480.32 2480.31,3488.19 2480.31,3507.87 2468.5,3519.69 2468.5,3673.23 2456.69,3685.04 2456.69,3704.72 2460.63,3708.66 v2(2460.63,3826.77)
  MidLayer3 w5: v1(2251.97,2917.32) 2232.28,2897.64 2192.91,2897.64 2129.92,2960.63 2129.92,3149.61 2251.97,3271.65 v1(2291.34,3271.65)
BUS_D16: U1.C20 U3_CM.2 U5_CM.7 | length 3588.2
  Top Layer w7.87: U1.C20@1779.53,1889.76 v1(1799.21,1909.45)
  MidLayer3 w5: v1(1799.21,1909.45) 1818.9,1929.13 1818.9,2030.18 1818.9,2043.31 1818.9,2110.24 1905.51,2196.85 1988.19,2196.85 2015.75,2224.41 2015.75,2263.78 2027.56,2275.59 2027.56,2295.27 2066.93,2334.64 2066.93,2661.42 2153.54,2748.03 2488.19,2748.03 2807.09,3066.93 2807.09,3141.73 2807.09,3229.33 2807.09,3377.95 2807.09,3397.64 2838.58,3429.13 v2(2838.58,3500) ; v2(2051.18,3665.35) 2051.18,3578.74 2098.43,3531.5 2098.43,3519.68 2118.11,3500 v2(2118.11,3405.51)
  Bottom Layer w5: v2(2051.18,3665.35) 2086.61,3629.92 2763.78,3629.92 2826.77,3566.93 2826.77,3529.53 2838.58,3517.72 v2(2838.58,3500) 2818.9,3500 2807.09,3488.19 U5_CM.7@2807.09,3452.76 ; v2(2118.11,3405.51) U3_CM.2@2118.11,3452.76
BUS_D17: U1.G18 U3_CM.4 U5_CM.8 | length 3808.8
  Top Layer w7.87: U1.G18@1700.79,1732.28 v1(1720.47,1751.97)
  MidLayer3 w5: v1(1720.47,1751.97) 1740.16,1771.66 1740.16,2031.5 1740.16,2043.31 1740.16,2066.93 1893.7,2220.47 1921.26,2220.47 1952.76,2251.97 1952.76,2263.78 1964.57,2275.59 1964.57,2299.21 1952.76,2311.02 1952.76,2677.17 2047.24,2771.65 2480.31,2771.65 2775.59,3066.93 2775.59,3397.64 2807.09,3429.13 v2(2807.09,3523.62) ; v2(2019.68,3665.35) 2019.68,3590.55 2074.8,3535.43 2074.8,3519.68 2055.12,3500 v2(2055.12,3405.51)
  Bottom Layer w5: v2(2019.68,3665.35) 2066.93,3618.11 2696.85,3618.11 2751.97,3562.99 2751.97,3543.31 2771.65,3523.62 v2(2807.09,3523.62) 2807.09,3503.94 2775.59,3472.44 U5_CM.8@2775.59,3452.76 ; v2(2055.12,3405.51) U3_CM.4@2055.12,3452.76
BUS_D18: U1.G16 U3_CM.5 U5_CM.9 | length 3814.1
  Top Layer w7.87: U1.G16@1622.05,1732.28 v1(1641.73,1751.97)
  MidLayer3 w5: v1(1641.73,1751.97) 1661.42,1771.66 1661.42,2031.5 1661.42,2043.31 1661.42,2078.74 1696.85,2114.17 1755.91,2114.17 1889.76,2248.03 1889.76,2263.78 1901.57,2275.59 1901.57,2299.21 1929.13,2326.77 1929.13,2685.04 2039.37,2795.28 2472.44,2795.28 2744.09,3066.93 2744.09,3468.5 v2(2775.59,3500) ; v2(1988.19,3665.35) 1988.19,3566.93 2042.85,3512.27 2043.31,3512.27 2043.31,3496.06 2023.62,3476.38 v2(2023.62,3405.51)
  Bottom Layer w5: v2(1988.19,3665.35) 2047.24,3606.3 2688.98,3606.3 2732.28,3562.99 2732.28,3539.37 2724.41,3531.5 2724.41,3515.75 2740.16,3500 2744.09,3500 ; v2(2023.62,3405.51) U3_CM.5@2023.62,3452.76 ; U5_CM.9@2744.09,3452.76 2744.09,3500 ; v2(2775.59,3500) 2744.09,3500
BUS_D19: U1.G15 U3_CM.7 U5_CM.10 | length 3792.4
  Top Layer w7.87: U1.G15@1582.68,1732.28 v1(1602.36,1751.97)
  MidLayer3 w5: v1(1602.36,1751.97) 1582.68,1771.66 1582.68,2031.5 1582.68,2043.31 1582.68,2066.93 1716.54,2200.79 1807.09,2200.79 1826.77,2220.47 1826.77,2263.78 1838.58,2275.59 1838.58,2299.21 1858.27,2318.9 1858.27,2673.23 1874.02,2688.98 1874.02,2704.72 1988.19,2818.9 2464.57,2818.9 2712.6,3066.93 ; v2(1956.69,3665.35) 1956.69,3535.43 1980.31,3511.81 1980.31,3496.06 1960.63,3476.38 v2(1960.63,3405.51) ; 2712.46,3066.93 2712.57,3401.57 v2(2712.6,3500)
  Bottom Layer w5: v2(1956.69,3665.35) 2027.56,3594.49 2637.8,3594.49 2712.6,3519.69 v2(2712.6,3500) U5_CM.10@2712.6,3452.76 ; v2(1960.63,3405.51) U3_CM.7@1960.63,3452.76
BUS_D20: U1.G14 U3_CM.8 U5_CM.13 | length 3816.7
  Top Layer w7.87: U1.G14@1543.31,1732.28 v1(1562.99,1751.97)
  MidLayer3 w5: v1(1562.99,1751.97) 1543.31,1771.65 1543.31,2031.5 1543.31,2043.31 1543.31,2062.99 1692.91,2212.6 1771.65,2212.6 1803.15,2244.09 1803.15,2263.78 1791.34,2275.59 1791.34,2295.27 1838.58,2342.52 1838.58,2669.29 1826.77,2681.1 1826.77,2696.85 2027.56,2897.64 2106.3,2897.64 2129.92,2874.02 2314.96,2874.02 2342.52,2901.57 2342.52,2956.69 2362.2,2976.38 2468.5,2976.38 2507.87,3015.75 2539.37,3015.75 2590.55,3066.93 2590.55,3370.08 2570.87,3389.76 2570.87,3421.26 2618.11,3468.5 v2(2618.11,3523.62) ; v2(1925.2,3665.35) 1925.2,3555.12 1909.45,3539.37 1909.45,3519.68 1929.13,3500 v2(1929.13,3377.95)
  Bottom Layer w5: v2(1925.2,3665.35) 2007.87,3582.68 2559.06,3582.68 v2(2618.11,3523.62) 2618.11,3500 U5_CM.13@2618.11,3452.76 ; v2(1929.13,3377.95) U3_CM.8@1929.13,3452.76
BUS_D21: U1.F10 U3_CM.10 U5_CM.14 | length 3722.4
  Top Layer w7.87: v1(1366.14,1791.34) U1.F10@1385.83,1771.65
  MidLayer3 w5: v1(1366.14,1791.34) 1385.83,1811.02 1385.83,2031.49 1385.83,2043.31 1385.83,2110.24 1511.81,2236.22 1692.91,2236.22 1700.79,2244.09 1700.79,2263.78 1712.6,2275.59 1712.6,2291.34 1771.65,2350.39 1771.65,2673.23 1751.97,2692.91 1751.97,2708.66 1992.13,2948.82 2078.74,2948.82 2118.11,2988.19 2118.11,3153.54 2145.67,3181.1 2263.78,3299.21 2523.62,3299.21 2566.93,3342.52 2566.93,3362.2 2547.24,3381.89 2547.24,3429.13 2586.61,3468.5 v2(2586.61,3500) ; v2(1866.14,3405.51) 1866.14,3500 1885.83,3519.68 1885.83,3535.43 1893.7,3543.31 v2(1893.7,3665.35)
  Bottom Layer w5: v2(1866.14,3405.51) U3_CM.10@1866.14,3452.76 ; v2(1893.7,3665.35) 1988.19,3570.87 2535.43,3570.87 2586.61,3519.69 v2(2586.61,3500) U5_CM.14@2586.61,3452.76
BUS_D22: U1.G9 U3_CM.11 U5_CM.15 | length 3682.4
  Top Layer w7.87: v1(1326.77,1751.97) U1.G9@1346.46,1732.28
  MidLayer3 w5: v1(1326.77,1751.97) 1346.46,1771.65 1346.46,2031.5 1346.46,2043.31 1346.46,2098.43 1551.18,2303.15 1704.72,2303.15 1728.35,2326.77 1728.35,2669.29 1740.16,2681.1 1740.16,2716.54 1984.25,2960.63 2070.87,2960.63 2106.3,2996.06 2106.3,3200.79 2216.54,3311.02 2496.06,3311.02 v1(2543.31,3358.27) ; v2(1834.65,3405.51) 1834.65,3476.38 1854.33,3496.06 1854.33,3511.81 1846.46,3519.69 1846.46,3566.93 1862.2,3582.68 v2(1862.2,3665.35)
  Bottom Layer w5: v2(1834.65,3405.51) U3_CM.11@1834.65,3452.76 ; v2(1862.2,3665.35) 1968.5,3559.06 2507.87,3559.06 2535.43,3531.5 2535.43,3515.75 2555.12,3496.06 U5_CM.15@2555.12,3452.76 2555.12,3417.32 2555.12,3393.7 2543.31,3381.89 v1(2543.31,3358.27)
BUS_D23: U1.G8 U3_CM.13 U5_CM.16 | length 3762.3
  Top Layer w7.87: v1(1287.4,1751.97) U1.G8@1307.09,1732.28
  MidLayer3 w5: v1(1287.4,1751.97) 1307.09,1771.65 1307.09,2029.37 1307.09,2043.31 1307.09,2098.43 1366.14,2157.48 1366.14,2181.1 1500,2314.96 1641.73,2314.96 1700.79,2374.02 1700.79,2700.79 1812.99,2812.99 1972.44,2972.44 2062.99,2972.44 2094.49,3003.94 2094.49,3204.72 2212.6,3322.83 2480.31,3322.83 2527.56,3370.08 2527.56,3381.89 ; v2(1771.65,3377.95) 1771.65,3429.13 1811.02,3468.5 1811.02,3507.87 1830.71,3527.56 v2(1830.71,3665.35) ; 2527.56,3369.83 v2(2527.56,3401.57)
  Bottom Layer w5: v2(1771.65,3377.95) U3_CM.13@1771.65,3452.76 ; v2(1830.71,3665.35) 1948.82,3547.24 2496.06,3547.24 2511.81,3531.5 2511.81,3515.75 2503.94,3507.87 2503.94,3492.13 2523.62,3472.44 U5_CM.16@2523.62,3452.76 2527.56,3448.82 v2(2527.56,3401.57)
BUS_D24: U1.F9 U3_CM.42 U5_CM.29 | length 4190.7
  Top Layer w7.87: v1(1326.77,1791.34) U1.F9@1346.46,1771.65
  MidLayer2 w5: v1(1326.77,1791.34) 1307.09,1811.03 1307.09,2031.5 1307.09,2043.31 1307.09,2090.55 1295.28,2102.36 1295.28,2236.22 1397.64,2338.58 1606.3,2338.58 1657.48,2389.76 1657.48,2649.61 1677.17,2669.29 1677.17,2708.66 1728.35,2759.84 2011.81,2759.84 2043.31,2791.34 2043.31,2968.5 2106.3,3031.5 2106.3,3236.22 2354.33,3484.25 2354.33,3507.87 2346.46,3515.75 2346.46,3696.85 2377.95,3728.35 2377.95,3834.65 2444.88,3901.57 2472.77,3901.57 v2(2523.62,3952.42) ; v2(1771.65,3948.82) 1771.65,3850.39 1830.71,3791.34 v2(1830.71,3704.72)
  Bottom Layer w5: U3_CM.42@1771.65,3901.57 v2(1771.65,3948.82) ; v2(1830.71,3704.72) 1933.07,3807.09 2476.38,3807.09 2523.62,3854.33 U5_CM.29@2523.62,3901.57 v2(2523.62,3952.42)
BUS_D25: U1.G6 U3_CM.44 U5_CM.30 | length 4343.6
  Top Layer w7.87: v1(1208.66,1751.97) U1.G6@1228.35,1732.28
  MidLayer2 w5: v2(1834.65,3948.82) 1834.65,3854.33 1862.2,3826.77 v2(1862.2,3704.72)
  MidLayer3 w5: v1(1208.66,1751.97) 1188.98,1771.65 1161.42,1771.65 1149.61,1783.46 1149.61,2031.5 1149.61,2043.31 1149.61,2055.12 1165.35,2070.87 1165.35,2106.3 1397.64,2338.58 1633.86,2338.58 1677.17,2381.89 1677.17,2724.41 2003.94,3051.18 2031.5,3051.18 2070.87,3090.55 2070.87,3212.6 2204.72,3346.46 2440.94,3346.46 2472.44,3377.95 2472.44,3385.83 2484.25,3397.64 2484.25,3417.32 2490.16,3423.23 2543.31,3476.38 2543.31,3507.87 2535.43,3515.75 2535.43,3661.42 2562.99,3688.98 2562.99,3830.71 2574.8,3842.52 2574.8,3858.27 2555.12,3877.95 v2(2555.12,3952.76)
  Bottom Layer w5: U3_CM.44@1834.65,3901.57 v2(1834.65,3948.82) ; v2(1862.2,3704.72) 1952.76,3795.28 2519.68,3795.28 2543.31,3818.9 2543.31,3834.65 2535.43,3842.52 2535.43,3862.2 2555.12,3881.89 U5_CM.30@2555.12,3901.57 v2(2555.12,3952.76)
BUS_D26: U1.F6 U3_CM.45 U5_CM.31 | length 4150.5
  Top Layer w7.87: v1(1208.66,1791.34) U1.F6@1228.35,1771.65 v1(1208.66,1791.34)
  MidLayer2 w5: v2(1866.14,3948.82) 1866.14,3877.95 1885.83,3858.27 1885.83,3842.52 1877.95,3834.65 1877.95,3818.9 1893.7,3803.15 v2(1893.7,3704.72)
  MidLayer3 w5: v1(1208.66,1791.34) 1188.98,1811.02 1188.98,2031.5 1188.98,2043.31 1188.98,2094.49 1299.21,2204.72 1326.77,2204.72 1448.82,2326.77 1637.8,2326.77 1688.98,2377.95 1688.98,2708.66 1964.57,2984.25 2051.18,2984.25 2082.68,3015.75 2082.68,3209.65 2089.57,3216.54 2207.68,3334.65 2476.38,3334.65 2511.81,3370.08 2511.81,3389.76 2507.87,3393.7 2507.87,3417.32 2566.93,3476.38 2566.93,3507.87 2574.8,3515.75 2574.8,3590.55 2590.55,3606.3 2590.55,3677.17 2582.68,3685.04 2582.68,3704.72 2586.61,3708.66 v2(2586.61,3826.77)
  Bottom Layer w5: U3_CM.45@1866.14,3901.57 v2(1866.14,3948.82) ; v2(1893.7,3704.72) 1972.44,3783.46 2543.31,3783.46 v2(2586.61,3826.77) U5_CM.31@2586.61,3901.57
BUS_D27: U1.G12 U3_CM.47 U5_CM.32 | length 4240.1
  Top Layer w7.87: v1(1444.88,1751.97) U1.G12@1464.57,1732.28
  MidLayer2 w5: v2(1925.2,3704.72) 1925.2,3818.9 1948.82,3842.52 1948.82,3858.27 1929.13,3877.95 v2(1929.13,3972.44)
  MidLayer3 w5: v1(1444.88,1751.97) 1464.57,1771.66 1464.57,1836.62 1464.57,1958.66 1480.31,1974.41 1480.32,2031.5 1480.31,2043.31 1480.31,2185.04 1519.68,2224.41 1720.47,2224.41 1740.16,2244.09 ; 1736.22,2240.16 1740.16,2244.09 ; v2(2618.11,3850.39) 2618.11,3708.66 2622.05,3704.72 2622.05,3685.04 2614.17,3677.17 2614.17,3551.18 2598.43,3535.43 2598.43,3515.75 2606.3,3507.87 2606.3,3472.44 2559.06,3425.2 2559.06,3385.83 2578.74,3366.14 2578.74,3149.61 2523.62,3094.49 2480.31,3094.49 2468.5,3082.68 2468.5,3027.56 2456.69,3015.75 2377.95,3015.75 2318.9,2956.69 2318.9,2905.51 2299.21,2885.83 2137.8,2885.83 2114.17,2909.45 1972.44,2909.45 1803.15,2740.16 1803.15,2681.1 1783.46,2661.42 1783.46,2342.52 1728.35,2287.4 1728.35,2275.59 1740.16,2263.78 1740.16,2244.09
  Bottom Layer w5: v2(1925.2,3704.72) 1992.13,3771.65 2559.05,3771.65 2618.11,3830.71 v2(2618.11,3850.39) U5_CM.32@2618.11,3901.57 ; U3_CM.47@1929.13,3901.57 v2(1929.13,3972.44)
BUS_D28: U1.E16 U3_CM.48 U5_CM.35 | length 4272.3
  Top Layer w7.87: U1.E16@1622.05,1811.02 v1(1641.73,1830.71)
  MidLayer2 w5: v2(1956.69,3704.72) 1956.69,3795.28 1980.31,3818.9 1980.31,3834.65 1960.63,3854.33 v2(1960.63,3972.44)
  MidLayer3 w5: v1(1641.73,1830.71) 1622.05,1850.39 1622.05,2031.5 1622.05,2043.31 1622.05,2070.87 1740.16,2188.98 1814.96,2188.98 1866.14,2240.16 1866.14,2263.78 1854.33,2275.59 1854.33,2287.4 1901.57,2334.65 1901.57,2669.29 1885.83,2685.04 1885.83,2696.85 1996.06,2807.09 2468.5,2807.09 2732.28,3070.87 2732.28,3507.87 2724.41,3515.75 2724.41,3531.49 2732.28,3539.37 2732.28,3559.06 2716.54,3574.8 2716.54,3677.17 2708.66,3685.04 2708.66,3704.72 2712.6,3708.66 2712.6,3799.21 2732.28,3818.9 2732.28,3834.65 2712.6,3854.33 v2(2712.6,3952.76)
  Bottom Layer w5: v2(1956.69,3704.72) 2011.81,3759.84 2618.11,3759.84 2712.6,3854.33 U5_CM.35@2712.6,3901.57 v2(2712.6,3952.76) ; v2@1956.69,3972.44 v2(1960.63,3972.44) U3_CM.48@1960.63,3901.57
BUS_D29: U1.G17 U3_CM.50 U5_CM.36 | length 4345.4
  Top Layer w7.87: U1.G17@1661.42,1732.28 v1(1681.1,1751.97)
  MidLayer2 w5: v2(1988.19,3704.72) 1988.19,3763.78 2043.31,3818.9 2043.31,3834.65 2023.62,3854.33 v2(2023.62,3948.82)
  MidLayer3 w5: v1(1681.1,1751.97) 1700.79,1771.66 1700.79,2031.5 1700.79,2043.31 1700.79,2078.74 1724.41,2102.36 1759.84,2102.36 1889.76,2232.28 1917.32,2232.28 1929.13,2244.09 1929.13,2263.78 1917.32,2275.59 1917.32,2287.4 1940.94,2311.02 1940.94,2681.1 2043.31,2783.46 2476.38,2783.46 2763.78,3070.87 2763.78,3401.57 2795.28,3433.07 2795.28,3507.87 2779.53,3523.62 2771.65,3523.62 2751.97,3543.31 2751.97,3559.06 2740.16,3570.87 2740.16,3677.17 2748.03,3685.04 2748.03,3704.72 2744.09,3708.66 2744.09,3822.83 2763.78,3842.52 2763.78,3858.27 2744.09,3877.95 v2(2744.09,3976.38)
  Bottom Layer w5: v2(1988.19,3704.72) 2031.5,3748.03 2661.42,3748.03 2732.28,3818.9 2732.28,3834.65 2724.41,3842.52 2724.41,3862.2 2744.09,3881.89 U5_CM.36@2744.09,3901.57 v2(2744.09,3976.38) ; U3_CM.50@2023.62,3901.57 v2(2023.62,3948.82)
BUS_D30: U1.E19 U3_CM.51 U5_CM.37 | length 4148.1
  Top Layer w7.87: U1.E19@1740.16,1811.02 v1(1759.84,1830.71)
  MidLayer2 w5: v2(2019.68,3704.72) 2019.68,3767.72 2066.93,3814.96 2066.93,3834.65 2074.8,3842.52 2074.8,3858.27 2055.12,3877.95 v2(2055.12,3948.82)
  MidLayer3 w5: v1(1759.84,1830.71) 1779.53,1850.39 1779.53,1962.6 1803.15,1986.22 1803.15,2031.5 1803.15,2043.31 1803.15,2114.17 1897.64,2208.66 1956.69,2208.66 1992.12,2244.09 1992.12,2263.78 1980.31,2275.59 1980.31,2295.27 2055.12,2370.08 2055.12,2673.23 2047.24,2681.1 2047.24,2696.85 2110.23,2759.84 2484.25,2759.84 2787.4,3062.99 2787.4,3393.7 2818.9,3425.2 2818.9,3507.87 2826.77,3515.75 2826.77,3566.93 2779.53,3614.17 2779.53,3677.17 2771.65,3685.04 2771.65,3704.72 2775.59,3708.66 2775.59,3795.28 2795.28,3814.96 2795.28,3834.65 2775.59,3854.33 v2(2775.59,3952.76)
  Bottom Layer w5: v2(2019.68,3704.72) 2051.18,3736.22 2669.29,3736.22 2755.9,3822.83 2755.9,3834.65 2775.59,3854.33 U5_CM.37@2775.59,3901.57 v2(2775.59,3952.76) ; U3_CM.51@2055.12,3901.57 v2(2055.12,3948.82)
BUS_D31: U1.D22 U3_CM.53 U5_CM.38 | length 4026.1
  Top Layer w7.87: U1.D22@1858.27,1850.39 v1(1877.96,1870.08)
  MidLayer2 w5: v2(2051.18,3704.72) 2051.18,3755.91 2137.8,3842.52 2137.8,3862.2 2118.11,3881.89 v2(2118.11,3948.82)
  MidLayer3 w5: v1(1877.96,1870.08) 1897.64,1889.76 1897.64,2031.5 1897.64,2043.31 1897.64,2070.87 1929.13,2102.36 1929.13,2122.05 2055.12,2248.03 2055.12,2263.78 2043.3,2275.59 2043.3,2291.34 2078.74,2326.77 2078.74,2610.24 2204.72,2736.22 2492.12,2736.22 2818.9,3062.99 2818.9,3393.7 2858.27,3433.07 2858.27,3507.87 2850.39,3515.75 2850.39,3531.5 2866.14,3547.24 2866.14,3562.99 2803.15,3625.98 2803.15,3677.17 2811.02,3685.04 2811.02,3704.72 2807.09,3708.66 2807.09,3822.83 2826.77,3842.52 2826.77,3858.27 2807.09,3877.95 v2(2807.09,3952.76)
  Bottom Layer w5: v2(2051.18,3704.72) 2070.87,3724.41 2704.72,3724.41 2795.28,3814.96 2795.28,3834.65 2787.4,3842.52 2787.4,3862.2 2807.09,3881.89 U5_CM.38@2807.09,3901.57 v2(2807.09,3952.76) ; U3_CM.53@2118.11,3901.57 v2(2118.11,3948.82)
BUS_FLASH_NBUSY: U1.H25 U1_CM.A4 | length 1746.8
  Top Layer w5: U1.H25@1976.38,1692.91 1996.06,1712.6 2078.74,1712.6 2090.55,1712.6 2173.23,1712.6 2287.4,1826.77 2287.4,2011.81 2346.46,2070.87 2433.07,2157.48 2433.07,2263.78 2425.2,2271.65 2425.2,2291.34 2452.76,2318.9 2452.76,2606.3 2511.81,2665.35 2511.81,2818.9 2570.87,2877.95 2570.87,2996.07 v1(2527.56,3035.43)
  Top Layer w7.87: U1_CM.A4@2507.87,3056.1 v1(2527.56,3035.43)
BUS_FLASH_NCS: U1.A19 U1_CM.F2 | length 1632.8
  Top Layer w5: U1.A19@1740.16,1968.5 1740.16,1984.25 1724.41,2000 1724.41,2031.5 1724.41,2043.31 1724.41,2169.29 1803.15,2248.03 1803.15,2263.78 1795.27,2271.65 1795.27,2287.4 2011.81,2503.94 2011.81,2669.29 2027.56,2685.04 2027.56,2696.85 2114.17,2783.46 2114.17,2956.69 2129.92,2972.44 2129.92,3122.05 2212.6,3204.72 2271.65,3204.72 2291.34,3185.04 2291.34,3161.42 2299.21,3153.54 v1(2330.71,3153.54) ; U1_CM.F2@2310.03,3134.85 U1_CM.F2@2311.02,3134.84
  Top Layer w7.87: U1_CM.F2@2311.02,3134.84 v1(2330.71,3153.54)
BUS_FLASH_NRESET: U1.M22 U1_CM.B5 | length 2096
  Top Layer w7.87: U1.M22@1858.27,1535.43 v1(1877.96,1555.12) ; v1(2448.82,3035.43) U1_CM.B5@2468.5,3016.73
  MidLayer1 w5: v1(1877.96,1555.12) 1897.64,1574.8 2078.74,1574.8 2090.55,1574.8 2181.1,1574.8 2374.02,1767.72 2374.02,2141.73 2456.69,2224.41 2496.06,2224.41 2519.68,2248.03 2519.68,2263.78 2543.31,2287.4 2543.31,2740.16 2559.06,2755.91 2559.06,3000 2543.31,3015.75 2507.87,3015.75 2488.19,3035.43 v1(2448.82,3035.43)
BUS_NBE0: RN33.6 RN34.7 U1.F11 U2_CM.15 U4_CM.39 | length 4268.9
  Top Layer w5: U2_CM.15@1771.65,3452.75 v2(1771.65,3503.93) ; v2(2429.13,3850.39) U4_CM.39@2429.13,3901.57
  Top Layer w7.87: v1(1405.51,1791.34) U1.F11@1425.2,1771.65
  MidLayer2 w5: v1(1405.51,1791.34) 1385.83,1811.02 1385.83,2031.49 1385.83,2043.31 1385.83,2200.79 1425.2,2240.16 1425.2,2259.84 1413.38,2271.65 1413.38,2283.46 1444.88,2314.96 1614.17,2314.96 1681.1,2381.89 1681.1,2641.73 1700.79,2661.42 1700.79,2700.79 1736.22,2736.22 2023.62,2736.22 2102.36,2814.96 2102.36,2988.19 2129.92,3015.75 2129.92,3228.35 2370.08,3468.5 2417.32,3468.5 2440.94,3492.13 2440.94,3507.87 2448.82,3515.75 2448.82,3531.5 2425.2,3555.12 2425.2,3677.17 2433.07,3685.04 2433.07,3704.72 2429.13,3708.66 v2(2429.13,3850.39) ; v1(1742.14,3311.02) 1742.14,3376 1771.65,3405.51 v2(1771.65,3503.93)
  MidLayer3 w5: v2(1771.65,3503.93) 1771.65,3657.49 1748.03,3681.1 1748.03,3767.72 1862.2,3881.89 2397.64,3881.89 v2(2429.13,3850.39)
  Bottom Layer w5: RN33.6@1688.58,3311.02 v1(1742.14,3311.02) RN34.7@1779.53,3311.02 RN34.7@1779.92,3311.02
BUS_NBE1: RN37.5 RN38.8 U1.E10 U2_CM.39 U4_CM.40 | length 3939
  Top Layer w5: U2_CM.39@1803.14,3901.57 v2(1803.14,3850.39) 1803.14,3818.9 1818.89,3803.15 2374.02,3803.15 v2(2397.64,3826.77) U4_CM.40@2397.64,3901.57
  Top Layer w7.87: v1(1366.14,1830.71) U1.E10@1385.83,1811.02
  MidLayer2 w5: v1(1366.14,1830.71) 1346.46,1850.39 1346.46,2031.5 1346.46,2043.31 1346.46,2220.47 1397.64,2271.65 1397.64,2283.47 1440.94,2326.77 1610.24,2326.77 1669.29,2385.83 1669.29,2645.67 1688.98,2665.35 1688.98,2704.72 1732.28,2748.03 2015.75,2748.03 2090.55,2822.83 2090.55,2996.06 2118.11,3023.62 2118.11,3232.28 2366.14,3480.32 2409.45,3480.32 2417.32,3488.19 2417.32,3507.87 2405.51,3519.68 2405.51,3673.23 2393.7,3685.04 2393.7,3704.72 2397.64,3708.66 v2(2397.64,3826.77)
  MidLayer3 w5: v1(1618.11,4055.11) 1653.55,4055.11 1708.66,4000 1708.66,3944.88 v2@1803.15,3850.39
  Bottom Layer w5: RN37.5@1586.22,4055.11 v1(1618.11,4055.11) RN38.8@1676.19,4055.12 RN38.8@1677.17,4055.11
BUS_NBE2: RN33.5 RN34.8 U1.F18 U3_CM.15 U5_CM.39 | length 4936.7
  Top Layer w7.87: U1.F18@1700.79,1771.65 v1(1720.47,1791.34)
  MidLayer2 w5: v1(1720.47,1791.34) 1700.79,1811.02 1700.79,1866.14 1700.79,1952.75 1700.79,2031.49 1700.79,2043.31 1700.79,2051.18 1881.89,2232.28 1921.26,2232.28 1992.13,2303.15 1992.13,2673.23 1980.31,2685.04 1980.31,2696.85 1996.06,2712.6 2035.43,2712.6 2125.98,2803.15 2125.98,2976.38 2181.1,3031.5 2181.1,3177.17 2228.35,3224.41 2460.63,3224.41 2476.38,3208.66 2716.54,3208.66 2862.2,3354.33 2862.2,3374.02 2881.89,3393.7 2881.89,3507.87 2889.76,3515.75 2889.76,3531.5 2881.89,3539.37 2881.89,3732.28 2858.27,3755.91 2858.27,3834.65 2838.58,3854.33 v2(2838.58,3976.38)
  MidLayer3 w5: v2(1708.66,3377.95) 1708.66,3409.45 1791.34,3492.13 1791.34,3511.81 1783.46,3519.68 1783.46,3688.98 v2(1799.21,3704.72)
  Bottom Layer w5: U3_CM.15@1708.66,3452.76 v2(1708.66,3377.95) 1708.66,3362.2 1688.98,3342.52 1688.98,3331.1 1688.58,3330.71 RN34.8@1779.53,3330.71 ; v2@1799.21,3696.85 1811.02,3685.04 2078.74,3685.04 2106.3,3712.6 2712.6,3712.6 2818.9,3818.9 2818.9,3834.65 2838.58,3854.33 U5_CM.39@2838.58,3901.57 v2(2838.58,3976.38)